# Altium PCB Transmitter_PCB.PcbDoc
Units mil, origin at the board's own origin, x right, y up, seen from the top; angles counter-clockwise.
Board outline 6000 x 4000 mil, 2 copper layers (Top Layer, Bottom Layer); 26 components, 16 nets, 90 pads, 0 vias.
Unrouted connection lines stored in the file: 62.
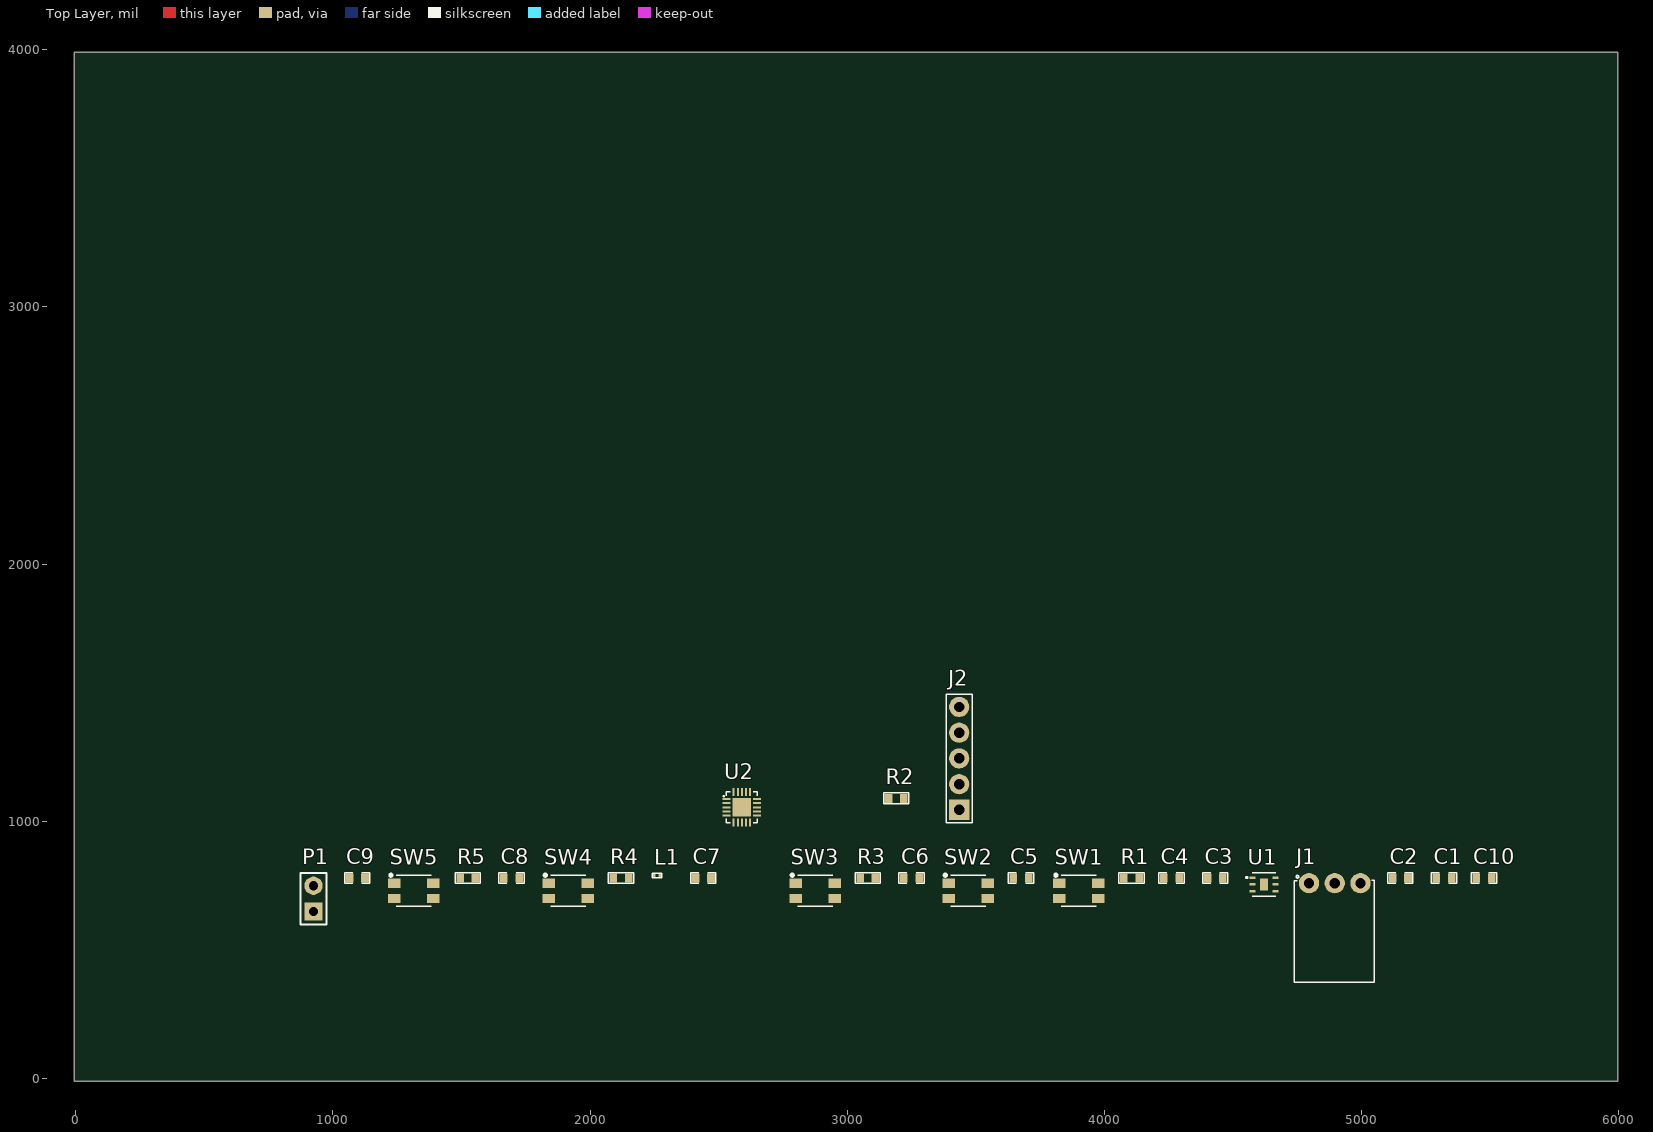
[diagram p0: Top Layer view]
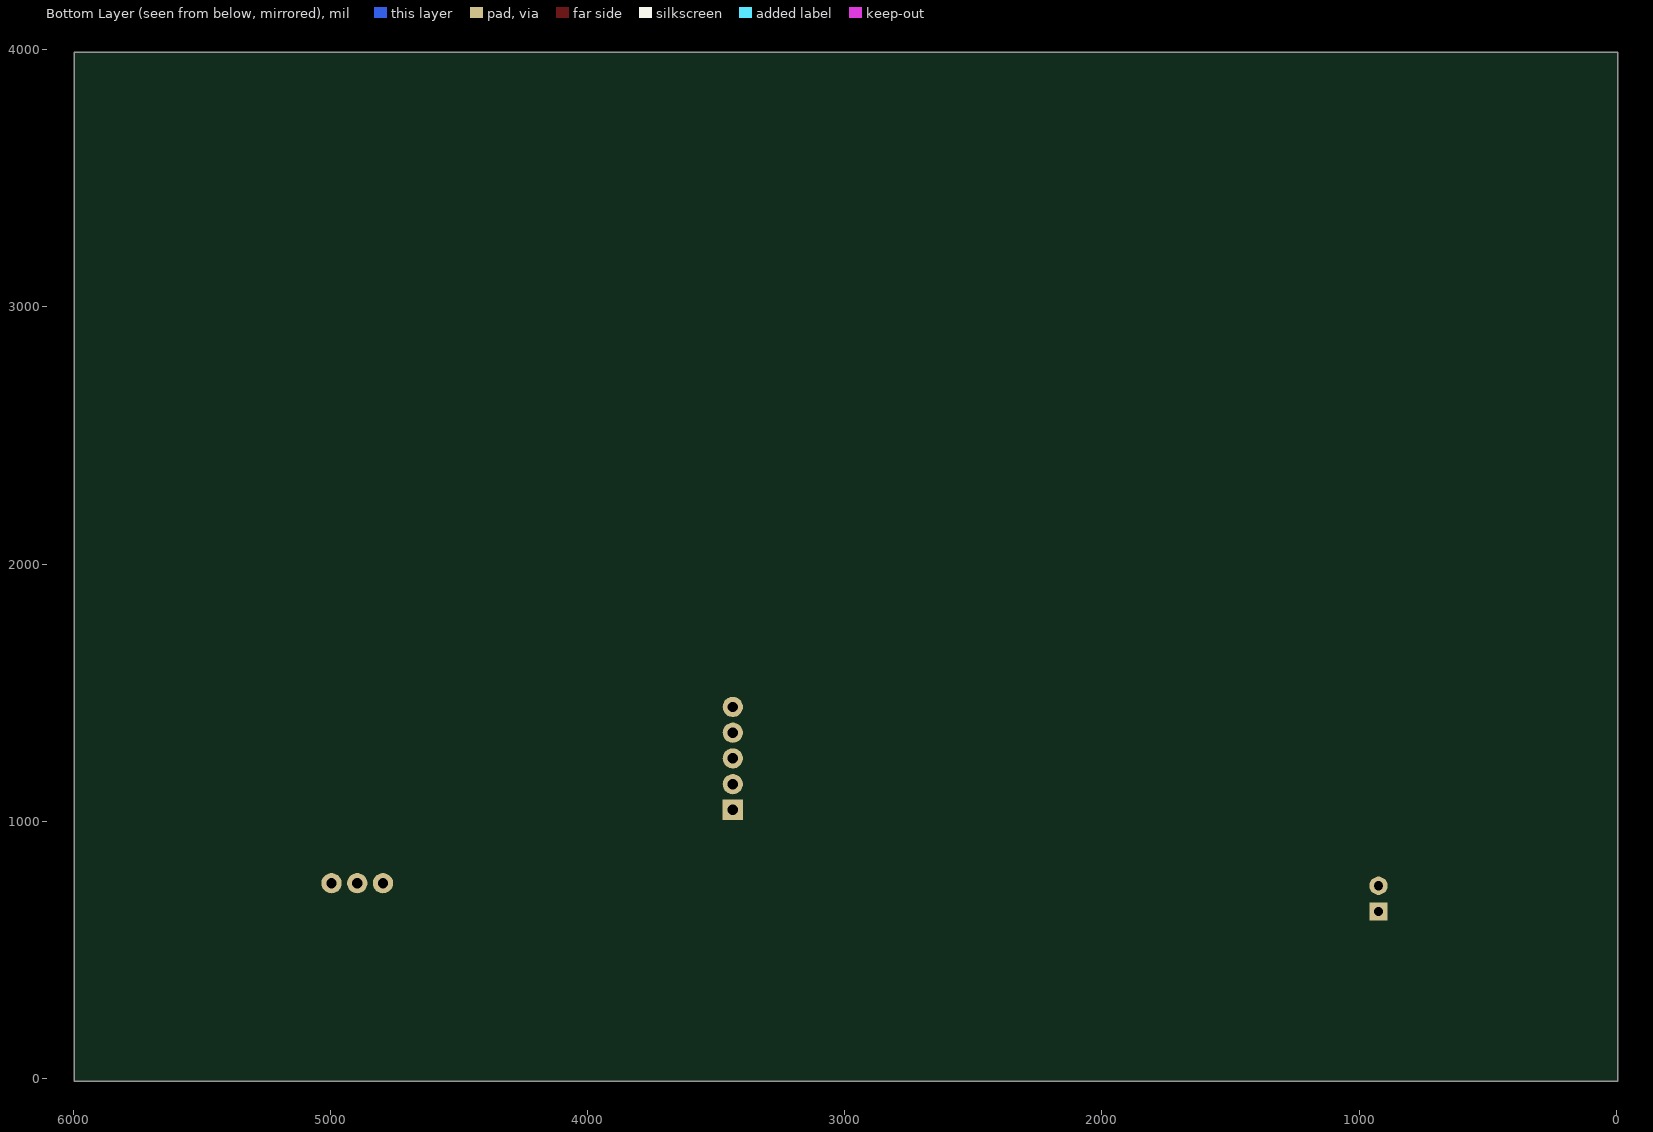
[diagram p1: Bottom Layer view, seen from below]

## Layer stack, top to bottom
Top Solder: solder mask 0.4, Solder Resist, Dk 3.5
Top Layer: signal copper 1.4
Dielectric 1: dielectric 12.6, FR-4, Dk 4.8
Bottom Layer: signal copper 1.4
Bottom Solder: solder mask 0.4, Solder Resist, Dk 3.5

## Board outline
-5,-10 5995,-10 5995,3990 -5,3990

## Design rules (kind name [scope] priority, off if disabled: settings)
Clearance [All] p1: gap=10 ignorepadtopadclearanceinfootprint=FALSE except(0: Arc-Hole Track-Hole SMDPad-Hole THPad-Hole Via-Hole Fill-Hole Poly-Hole Region-Hole Text-Hole)
PolygonConnect [All] p1: connectstyle=Relief reliefconductorwidth=10 reliefentries=4 polygonreliefangle="90 Angle" airgapwidth=10
RoutingVias [All] p1: holewidth=28 width=50 viastyle="Through Hole" minholewidth=28 minwidth=50 maxholewidth=28 maxwidth=50
SolderMaskExpansion [All] p1: expansion=4 istentingtop=FALSE
Width [All] p1: maxlimit=10 minlimit=10 preferedwidth=10
30 further rules are at their usual default settings.

## Components (designator, comment, footprint, x,y, rotation, side; value= is the part's Value field where it differs from the comment)
C1 "0.47uF" Cap0603 5320,780 r0 top
C2 "0.47uF" Cap0603 5150,780 r0 top
C3 "0.1uF" Cap0603 4430,780 r0 top
C4 "1uF" Cap0603 4260,780 r0 top
C5 "0.1uF" Cap0603 3675,780 r0 top
C6 "0.1uF" Cap0603 3250,780 r0 top
C7 "0.1uF" Cap0603 2440,780 r0 top
C8 "0.1uF" Cap0603 1695,780 r0 top
C9 "0.1uF" Cap0603 1095,780 r0 top
C10 "0.1uF" Cap0603 5475,780 r0 top
J1 "FS1000A TX Module" DW254W-11-03-85 4795,760 r0 top
J2 "PZ254V-11-05P" HDR1X5 3435,1245 r90 top
L1 "MMZ0603S601CT000" "IND 0201" 2260,790 r0 top
P1 "61300211121" HDR1X2 925,650 r90 top
R1 "4.7K" RES-0603 4105,780 r0 top
R2 "4.7K" RES-0603 3190,1090 r0 top
R3 "4.7K" RES-0603 3080,780 r0 top
R4 "4.7K" RES-0603 2120,780 r0 top
R5 "4.7K" RES-0603 1525,780 r0 top
SW1 "TS-1185EC-C-D-B" TS-1185EC-C-D-B 3900,730 r0 top
SW2 "TS-1185EC-C-D-B" TS-1185EC-C-D-B 3470,730 r0 top
SW3 "TS-1185EC-C-D-B" TS-1185EC-C-D-B 2875,730 r0 top
SW4 "TS-1185EC-C-D-B" TS-1185EC-C-D-B 1915,730 r0 top
SW5 "TS-1185EC-C-D-B" TS-1185EC-C-D-B 1315,730 r0 top
U1 "LP5900SD-3.3/NOPB" WSON-6 4620,755 r0 top
U2 "ATTINY1616-MNR" 20-QFN 2590,1055 r0 top

## Footprints (in the part's own frame and the unit in brackets; to place one, negate y for a bottom-side part, rotate by r counter-clockwise, add the part's x,y. Pads: shape width x height; smd on the part's side, far side on the other; paste and mask are expansions set on the pad)
20-QFN [mm] "IC MCU 8BIT 16KB FLASH 20VQFN"
  rect 0.8x0.2 smd: 1(-1.5,0.8) 2(-1.5,0.4) 3(-1.5,0) 4(-1.5,-0.4) 5(-1.5,-0.8) 11(1.5,-0.8) 12(1.5,-0.4) 13(1.5,0) 14(1.5,0.4) 15(1.5,0.8)
  rect 0.2x0.8 smd: 6(-0.8,-1.5) 7(-0.4,-1.5) 8(0,-1.5) 9(0.4,-1.5) 10(0.8,-1.5) 16(0.8,1.5) 17(0.4,1.5) 18(0,1.5) 19(-0.4,1.5) 20(-0.8,1.5)
  rect 1.8x1.8 smd: 21(0,0)
  silkscreen extent -1.83,-1.52 1.52,1.52, body extent -1.5,-1.5 1.5,1.5, height 0.59
Cap0603 [mil]
  rect 30x35 smd mask+2.36: 1(-30,0) 2(30,0)
  silkscreen extent -49,-21 49,21, body extent -32,-16 31,16, height 34
DW254W-11-03-85 [mm] "3 pin  2.54mm 3A  Female Headers ROHS"
  round 2 hole 1.02: 1(0,0) 2(2.54,0) 3(5.08,0)
  silkscreen extent -1.47,-9.8 6.43,0.76, body extent -1.42,-9.72 6.45,0.34, height 2.45
HDR1X2 [mm] "CONN HEADER VERT 2POS 2.54MM"
  rect 1.8x1.8 hole 0.9: 1(0,0)
  round 1.8 hole 0.9: 2(2.54,0)
  silkscreen extent -1.27,-1.27 3.81,1.27, body extent -1.27,-1.27 3.81,1.27, height 8.44
HDR1X5 [mm] "Through Hole,P=2.54mm"
  rect 2x2 hole 1.02: 1(-5.08,0)
  round 2 hole 1.02: 2(-2.54,0) 3(0,0) 4(2.54,0) 5(5.08,0)
  silkscreen extent -6.35,-1.27 6.35,1.27, body extent -6.35,-1.27 6.35,1.27, height 8.64
"IND 0201" [mm]
  rect 0.25x0.3 smd mask+0.055: 1(-0.275,0) 2(0.275,0)
  silkscreen extent -0.48,-0.23 0.48,0.23, body extent -0.3,-0.15 0.3,0.15, height 0.15
RES-0603 [mil]
  rect 30x35 smd: 1(-30,0) 2(30,0)
  silkscreen extent -49,-21 49,21, body extent -31,-17 31,17, height 18
TS-1185EC-C-D-B [mm]
  rect 1.25x0.9 smd: 1(-1.925,0.75) 1(1.925,0.75) 2(-1.925,-0.75) 2(1.925,-0.75)
  silkscreen extent -2.39,-1.52 1.73,1.68, body extent -2.33,-1.5 2.32,1.5, height 2
WSON-6 [mm]
  rect 0.6x0.25 smd: 1(-1.15,0.65) 2(-1.15,0) 3(-1.15,-0.65) 4(1.15,-0.65) 5(1.15,0) 6(1.15,0.65)
  rect 0.75x1.2 smd: 7(0,0)
  silkscreen extent -1.74,-1.14 1.17,1.14, body extent -1.25,-1.1 1.25,1.1, height 0.8

## Part data
C1 C2: library part UMK107B7474KA-TR, "CAP CER 0.47uF 50V X7R 0603", Capacitance=470nF, Case Code (Imperial)=0603, Case Code (Metric)=1608, Dielectric=X7R, Manufacturer="Taiyo Yuden", Max Operating Temperature=125°C, Min Operating Temperature=-55°C, Package Quantity=1, Supplier Part Number 1=587-3170-1-ND, Tolerance=10%, Voltage=50V, Case/Package=0603, Category="Ceramic Capacitors", ComponentLink1Description=https://datasheet.ciiva.com/30063/972umk107b7474ka-tr-30063804.pdf?src-supplier=Onlinecomponents.com, ComponentLink1URL=https://datasheet.ciiva.com/30063/972umk107b7474ka-tr-30063804.pdf?src-supplier=Onlinecomponents.com, ComponentLink2Description=https://datasheet.ciiva.com/11600/umk107b7474ka-tr-ss-11600367.pdf?src-supplier=Avnet, ComponentLink2URL=https://datasheet.ciiva.com/11600/umk107b7474ka-tr-ss-11600367.pdf?src-supplier=Avnet, ComponentLink3Description=https://datasheet.ciiva.com/15922/257umk107b7474ka-tr-15922607.pdf?src-supplier=Onlinecomponents.com, ComponentLink3URL=https://datasheet.ciiva.com/15922/257umk107b7474ka-tr-15922607.pdf?src-supplier=Onlinecomponents.com, ComponentLink4Description=https://datasheet.ciiva.com/6274/mlcc-all-e-6274710.pdf?src-supplier=Digi-Key, ComponentLink4URL=https://datasheet.ciiva.com/6274/mlcc-all-e-6274710.pdf?src-supplier=Digi-Key, ComponentLink5Description=https://datasheet.ciiva.com/5412/mlcc01-e-5412119.pdf?src-supplier=Mouser, ComponentLink5URL=https://datasheet.ciiva.com/5412/mlcc01-e-5412119.pdf?src-supplier=Mouser, ComponentLink6Description=https://datasheet.ciiva.com/6274/mlcc-all-e-6274712.pdf?src-supplier=Digi-Key, ComponentLink6URL=https://datasheet.ciiva.com/6274/mlcc-all-e-6274712.pdf?src-supplier=Digi-Key, ComponentLink7Description=https://datasheet.ciiva.com/6274/mlcc-all-e-6274713.pdf?src-supplier=Digi-Key, ComponentLink7URL=https://datasheet.ciiva.com/6274/mlcc-all-e-6274713.pdf?src-supplier=Digi-Key, Construction=Flat, Depth=0.8mm, Halogen Free="Halogen Free", Height=0.8mm, Lead Free="Lead Free", Length=1.6mm, Manufacturer Part Number=UMK107B7474KA-TR, Mount="Surface Mount", Packaging="Tape and Reel", Pricing 1="1=0.21000, 10=0.14800, 50=0.08400, 100=0.06950, 500=0.04876, 1000=0.04036 (USD)", Radiation Hardening=No, RoHS=Yes, RoHS Compliant=Yes, Series=M, Stock 1=81, Supplier 1=Digi-Key, Termination=SMD/SMT, Thickness=0.035inch, Voltage Rating=50V, Voltage Rating (DC)=50V, Width=0.031inch
C3 C5 C6 C7 C8 C9 C10: library part CC0603ZRY5V9BB104, "CAP CER 0.1UF 50V Y5V 0603", Capacitance=100nF, Case Code (Imperial)=0603, Case Code (Metric)=1608, Dielectric=Y5V, Manufacturer=Yageo, Max Operating Temperature=85°C, Min Operating Temperature=-30°C, Package Quantity=1, Supplier Part Number 1=311-1343-1-ND, Tolerance=80%, Voltage=50V, Case/Package=0603, ComponentLink1Description=http://www.yageo.com/documents/recent/UPY-GPHC_Y5V_6.3V-to-50V_8.pdf?src-supplier=Digi-Key, ComponentLink1URL=http://www.yageo.com/documents/recent/UPY-GPHC_Y5V_6.3V-to-50V_8.pdf?src-supplier=Digi-Key, ComponentLink2Description=http://www.yageo.com/documents/recent/UPY-GPHC_Y5V_6.3V-to-50V_5.pdf?src-supplier=Avnet+Europe, ComponentLink2URL=http://www.yageo.com/documents/recent/UPY-GPHC_Y5V_6.3V-to-50V_5.pdf?src-supplier=Avnet+Europe, ComponentLink3Description=https://www.verical.com/server-webapp/html/getDatasheet?partID=403611&src-supplier=Verical, ComponentLink3URL=https://www.verical.com/server-webapp/html/getDatasheet?partID=403611&src-supplier=Verical, ComponentLink4Description=http://www.mouser.com/ds/2/447/Yageo_UPY-GP_NP0_16V-to-50V_9-358835.pdf?src-supplier=Mouser, ComponentLink4URL=http://www.mouser.com/ds/2/447/Yageo_UPY-GP_NP0_16V-to-50V_9-358835.pdf?src-supplier=Mouser, ComponentLink5Description=http://www.farnell.com/datasheets/1132289.pdf?src-supplier=Element14, ComponentLink5URL=http://www.farnell.com/datasheets/1132289.pdf?src-supplier=Element14, Composition=Ceramic, Depth=0.8mm, Halogen Free="Halogen Free", Height=0.8mm, Lead Free="Lead Free", Length=1.6mm, Manufacturer Part Number=CC0603ZRY5V9BB104, Mount="Surface Mount", Number of Pins=2, Packaging="Tape and Reel", Pricing 1="1=0.1, 10=0.075, 100=0.0334, 500=0.02386, 1000=0.01874 (USD)", Radiation Hardening=No, REACH SVHC="No SVHC", Stock 1=15000880, Supplier 1=Digi-Key, Termination=SMD/SMT, Thickness=0.035inch, Voltage Rating=50V, Voltage Rating (DC)=50V, Width=0.031inch
C4: library part CC0603KRX5R8BB105, "CAP CER 1UF 25V X5R 0603", Case Code (Imperial)=0603, Case Code (Metric)=1608, Dielectric=X5R, Manufacturer=Yageo, Max Operating Temperature=85°C, Min Operating Temperature=-55°C, Package Quantity=1, Supplier Part Number 1=311-1445-6-ND, Tolerance=10%, Voltage Rating=25V, Capacitance=1uF, Case/Package=0603, ComponentLink1Description=http://www.yageo.com/documents/recent/UPY-GPHC_X5R_4V-to-50V_25.pdf?src-supplier=Digi-Key, ComponentLink1URL=http://www.yageo.com/documents/recent/UPY-GPHC_X5R_4V-to-50V_25.pdf?src-supplier=Digi-Key, ComponentLink2Description=http://www.yageo.com/documents/recent/UPY-GPHC_X5R_4V-to-50V_12.pdf?src-supplier=Avnet+Europe, ComponentLink2URL=http://www.yageo.com/documents/recent/UPY-GPHC_X5R_4V-to-50V_12.pdf?src-supplier=Avnet+Europe, ComponentLink3Description=http://www.farnell.com/datasheets/1525783.pdf?src-supplier=Element14, ComponentLink3URL=http://www.farnell.com/datasheets/1525783.pdf?src-supplier=Element14, ComponentLink4Description=http://www.yageo.com/documents/recent/UPY-GPHC_X5R_4V-to-50V_12.pdf?src-supplier=Avnet, ComponentLink4URL=http://www.yageo.com/documents/recent/UPY-GPHC_X5R_4V-to-50V_12.pdf?src-supplier=Avnet, Depth=0.8mm, Halogen Free="Halogen Free", Height=0.8mm, Lead Free="Lead Free", Length=1.6mm, Manufacturer Part Number=CC0603KRX5R8BB105, Mount="Surface Mount", Number of Pins=2, Packaging="Tape and Reel", Pricing 1="1=0.1, 10=0.069, 100=0.0307, 500=0.0219, 1000=0.0172 (USD)", Radiation Hardening=No, REACH SVHC="No SVHC", Stock 1=1419041, Supplier 1=Digi-Key, Termination=SMD/SMT, Thickness=0.035inch, Voltage Rating (DC)=25V, Width=0.031inch
J1: library part DW254W-11-03-85, "3 PIN 2.54mm 3A Female Headers ROHS", Current Rating (Max)=3A, Manufacturer=DEALON, Holes Structure=1x3P, Insulation Height=8.5mm, Mounting Type=Shrouded, Pitch=2.54mm
J2: "Pin Header 5 1 right-angle", Manufacturer=XFCN, ComponentLink1Description=LCSC, ComponentLink1URL=https://lcsc.com/product-detail/Pin-Headers_XFCN-PZ254V-11-05P_C492404.html, Manufacturer Part Number=PZ254V-11-05P
L1: "FERRITE BEAD 600 OHM 0201 1LN", Case Code (Imperial)=0201, Case Code (Metric)=0603, Current Rating=100mA, DC Resistance (DCR)=1.45R, Manufacturer=TDK, Package Quantity=15000, Supplier Part Number 1=445-2146-1-ND, Tolerance=25%, Case/Package=0201, Category=Inductors, ComponentLink1Description=https://datasheet.ciiva.com/46381/1795294-46381669.pdf?src-supplier=Element14, ComponentLink1URL=https://datasheet.ciiva.com/46381/1795294-46381669.pdf?src-supplier=Element14, ComponentLink2Description=https://datasheet.ciiva.com/46634/beads-commercial-signal-mmz-en-46634390.pdf?src-supplier=Digi-Key, ComponentLink2URL=https://datasheet.ciiva.com/46634/beads-commercial-signal-mmz-en-46634390.pdf?src-supplier=Digi-Key, ComponentLink3Description=https://datasheet.ciiva.com/48682/beads-commercial-signal-mmz-en-48682603.pdf?src-supplier=Avnet, ComponentLink3URL=https://datasheet.ciiva.com/48682/beads-commercial-signal-mmz-en-48682603.pdf?src-supplier=Avnet, ComponentLink4Description=https://datasheet.ciiva.com/46634/beads-commercial-signal-mmz-en-46634381.pdf?src-supplier=Digi-Key, ComponentLink4URL=https://datasheet.ciiva.com/46634/beads-commercial-signal-mmz-en-46634381.pdf?src-supplier=Digi-Key, Core Material=Ferrite, Height=0.013inch, Impedance=600R, Lead Free="Lead Free", Length=0.024inch, Manufacturer Part Number=MMZ0603S601CT000, Max DC Current=100mA, Mount="Surface Mount", Packaging="Cut Tape", Pricing 1="1=0.12000, 10=0.09900, 25=0.07680, 50=0.06380, 100=0.05500, 250=0.04400, 500=0.03960, 1000=0.03300, 5000=0.03080 (USD)", REACH SVHC="No SVHC", RoHS=Yes, RoHS Compliant=Yes, Stock 1=1540, Supplier 1=Digi-Key, Width=0.012inch
P1: library part "Header 1x2", "CONN HEADER VERT 2POS 2.54MM", Color=Black, Current Rating=3A, Manufacturer="Wurth Electronics", Max Operating Temperature=125°C, Min Operating Temperature=-40°C, Supplier Part Number 1=732-5315-ND, Voltage Rating=250V, ComponentLink1Description=http://www.mouser.com/ds/2/445/6130xx11121-538006.pdf?src-supplier=Mouser, ComponentLink1URL=http://www.mouser.com/ds/2/445/6130xx11121-538006.pdf?src-supplier=Mouser, Connector Type="Male Pin", Contact Gender=Male, Contact Material="Copper Alloy,Copper", Contact Mating Length=0.236inch, Contact Plating=Gold, Gender=Male, Housing Material=PBT, Lead Free="Lead Free", Manufacturer Part Number=61300211121, Mount="Through Hole", Number of Contacts=2, Number of Positions=2, Number of Rows=1, Packaging=Bulk, Pitch=0.1inch, Pricing 1="1=0.13, 10=0.106, 25=0.088, 50=0.074, 100=0.067, 1000=0.061 (USD)", REACH SVHC=Unknown, Stock 1=219205, Supplier 1=Digi-Key, Termination="Through Hole"
R1 R2 R3 R4 R5: library part RC0603FR-074K7L, "RES SMD 4.7K OHM 1% 1/10W 0603", Case Code (Imperial)=0603, Case Code (Metric)=1608, Manufacturer=Yageo, Max Operating Temperature=155°C, Max Power Dissipation=100mW, Min Operating Temperature=-55°C, Resistance=4.7kR, Resistance Tolerance=1%, Resistor Type="Thick Film", Supplier Part Number 1=311-4.70KHRCT-ND, Temperature Coefficient=100ppm/°C, Voltage Rating=50V, Case/Package=0603, Category="Chip SMD Resistors", ComponentLink1Description=https://datasheet.ciiva.com/15189/getdatasheetpartid-422754-15189760.pdf?src-supplier=Verical, ComponentLink1URL=https://datasheet.ciiva.com/15189/getdatasheetpartid-422754-15189760.pdf?src-supplier=Verical, ComponentLink2Description=https://datasheet.ciiva.com/22747/443971-22747528.pdf?src-supplier=Element14, ComponentLink2URL=https://datasheet.ciiva.com/22747/443971-22747528.pdf?src-supplier=Element14, ComponentLink3Description=https://datasheet.ciiva.com/7660/38590-7660794.pdf?src-supplier=Element14, ComponentLink3URL=https://datasheet.ciiva.com/7660/38590-7660794.pdf?src-supplier=Element14, ComponentLink4Description=https://datasheet.ciiva.com/7746/1868787-7746365.pdf?src-supplier=Element14, ComponentLink4URL=https://datasheet.ciiva.com/7746/1868787-7746365.pdf?src-supplier=Element14, ComponentLink5Description=https://datasheet.ciiva.com/46440/1868787-46440909.pdf?src-supplier=Element14, ComponentLink5URL=https://datasheet.ciiva.com/46440/1868787-46440909.pdf?src-supplier=Element14, ComponentLink6Description=https://datasheet.ciiva.com/7746/1738695-7746366.pdf?src-supplier=Element14, ComponentLink6URL=https://datasheet.ciiva.com/7746/1738695-7746366.pdf?src-supplier=Element14, Construction=Rectangular, Depth=0.8mm, Features="Moisture Resistant", Height=0.45mm, Lead Free="Lead Free", Lead Pitch=0.3mm, Length=1.6mm, Manufacturer Part Number=RC0603FR-074K7L, Military Standard=Not, Number of Pins=2, Number of Terminations=2, Packaging="Tape and Reel", Power Rating=100mW, Pricing 1="1=0.10000, 10=0.02400, 100=0.00970, 1000=0.00436, 2500=0.00378 (USD)", REACH SVHC="No SVHC", RoHS=Yes, RoHS Compliant=Yes, Series=RC, Size Code=0603, Stock 1=1924316, Supplier 1=Digi-Key, Termination=SMD/SMT, Tolerance=1%, Voltage Rating (DC)=50V, Width=0.8mm
SW1 SW2 SW3 SW4 SW5: "3mm 2mm Round Button 50mA Top3.65mm SPST 12V SMD Tactile Switches", Manufacturer=XKB, Package=Custom, ComponentLink1Description=LCSC, ComponentLink1URL=https://lcsc.com/product-detail/Tactile-Switches_XKB-Connectivity-TS-1185EC-C-D-B_C318893.html, Manufacturer Part No=TS-1185EC-C-D-B
U1: "IC REG LINEAR 3.3V 150MA 6WSON", Dropout Voltage=80mV, Manufacturer="TI National Semiconductor", Max Input Voltage=5.5V, Max Operating Temperature=85°C, Max Output Current=150mA, Max Supply Current=230uA, Min Input Voltage=2.5V, Min Operating Temperature=-40°C, Nominal Output Voltage=3.3V, Output Voltage Accuracy=2%, Package Quantity=1000, Power Supply Rejection Ratio (PSRR)=40dB, Quiescent Current=50uA, Supplier Part Number 1=LP5900SD-3.3/NOPBCT-ND, Accuracy=2%, Category="Voltage Regulators - Linear", ComponentLink1Description=https://datasheet.ciiva.com/3223/lp5900-3223991.pdf?src-supplier=Avnet, ComponentLink1URL=https://datasheet.ciiva.com/3223/lp5900-3223991.pdf?src-supplier=Avnet, ComponentLink2Description=https://datasheet.ciiva.com/6598/lp5900-6598143.pdf?src-supplier=Digi-Key, ComponentLink2URL=https://datasheet.ciiva.com/6598/lp5900-6598143.pdf?src-supplier=Digi-Key, ComponentLink3Description=https://datasheet.ciiva.com/6598/lp5900-6598142.pdf?src-supplier=Digi-Key, ComponentLink3URL=https://datasheet.ciiva.com/6598/lp5900-6598142.pdf?src-supplier=Digi-Key, Height=0.8mm, Lead Free="Lead Free", Length=2.2mm, Manufacturer Part Number=LP5900SD-3.3/NOPB, Max Supply Voltage=5.5V, Min Supply Voltage=2.5V, Mount="Surface Mount", Number of Outputs=1, Number of Pins=6, Number of Regulators=1, Output Configuration=Positive, Output Current=150mA, Output Type=Fixed, Output Voltage=3.3V, Packaging="Tape and Reel", Polarity=Positive, Pricing 1="1=1.01000, 10=0.90700, 25=0.86080, 100=0.70700, 250=0.66092, 500=0.58406 (USD)", Radiation Hardening=No, REACH SVHC="No SVHC", RoHS=Yes, Series=-, Stock 1=36260, Supplier 1=Digi-Key, Termination=SMD/SMT, Width=2.5mm
U2: "IC MCU 8BIT 16KB FLASH 20VQFN", Case/Package=VQFN, Frequency=20MHz, Manufacturer=Microchip, Max Operating Temperature=105°C, Min Operating Temperature=-40°C, Supplier Part Number 1=ATTINY1616-MNRCT-ND, Category=Microcontrollers, ComponentLink1Description=http://www.microchip.com/mymicrochip/filehandler.aspx?ddocname=en606269&src-supplier=Digi-Key, ComponentLink1URL=http://www.microchip.com/mymicrochip/filehandler.aspx?ddocname=en606269&src-supplier=Digi-Key, Core Architecture=AVR, Interface=I2C,SPI,IrDA,UART,USART, Manufacturer Part Number=ATTINY1616-MNR, Memory Size=16KB, Memory Type=FLASH, Number of I/Os=18, Oscillator Type=Internal, Packaging="Cut Tape", Peripherals="Brown-out Detect/Reset,POR,PWM,WDT", Pricing 1="1=0.75000, 25=0.69000, 100=0.62000 (USD)", RoHS=No, Stock 1=3963, Supplier 1=Digi-Key

## Nets (pads, with @x,y where several pads share a name; then routed paths per layer and width w, separated by ;. In a path a pad name is that pad's centre, name@x,y a point inside that pad or via, vN(x,y) a via of type N, cw(c..) or ccw(c..) an arc to the next point about the centre after c; other vN are vias at no path point)
BUTTON1: C5.1 R1.2 SW1.1 U2.1
BUTTON2: SW3.1 U2.5
BUTTON3: SW4.1 U2.6
BUTTON4: SW5.1 U2.7
GND: C1.2 C2.2 C3.2 C4.2 C5.2 C6.2 C7.2 C8.2 C9.2 C10.2 J1.1 J2.5 P1.2 SW1.2 SW2.2 SW3.2 SW4.2 SW5.2 U1.3 U1.7 U2.3 U2.21
NetC7_1: C7.1 R3.2
NetC8_1: C8.1 R4.2
NetC9_1: C9.1 R5.2
NetL1_2: L1.2 U2.4
RESET: C6.1 R2.2 SW2.1 U2.19
RESET#: J2.4 R2.1
RXD: J2.3 U2.11
TX_DIN: J1.3 U2.20
TXD: J2.2 U2.12
VBAT: C1.1 P1.1 U1.4 U1.6
VCC_3V3: C2.1 C3.1 C4.1 C10.1 J1.2 J2.1 L1.1 R1.1 R3.1 R4.1 R5.1 U1.1
pads on no net: U1.2 U1.5 U2.2 U2.8 U2.9 U2.10 U2.13 U2.14 U2.15 U2.16 U2.17 U2.18